# Altium PCB MonitorPCB-v1.1.PcbDoc (part 2 of 2)
Units mm, origin at the board's own origin, x right, y up, seen from the top; angles counter-clockwise.
Board outline 144.83 x 35 mm, 2 copper layers (Top Layer, Bottom Layer), stack 1.57 mm thick; 68 components, 45 nets, 203 pads, 57 vias.
Unrouted connection lines stored in the file: 41.
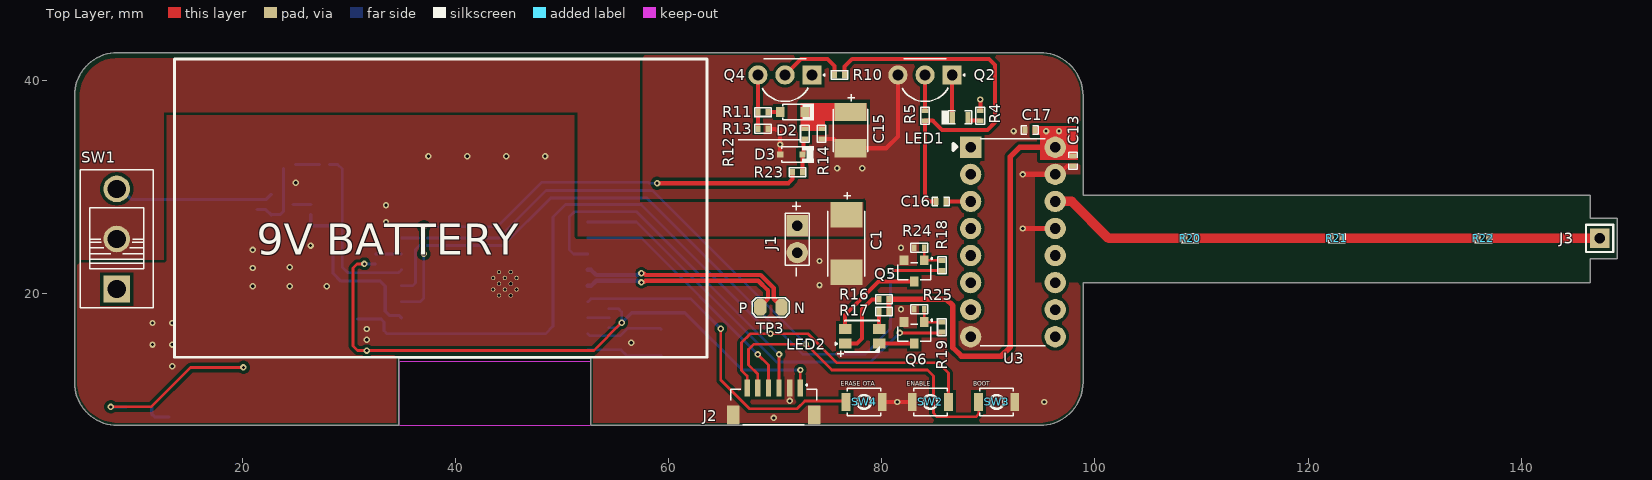
[diagram p0: Top Layer view]

## Part data (continued)
R12 R13 R14: library part RC0402FR-07100KL, "RES 100K OHM 1% 1/16W 0402", Case Code (Imperial)=0402, Case Code (Metric)=1005, LCSC Part Number=C60491, Manufacturer=Yageo, Max Operating Temperature=155°C, Max Power Dissipation=63mW, Min Operating Temperature=-55°C, Package Quantity=1, Resistance=100kR, Resistance Tolerance=1%, Resistor Type="Thick Film", Supplier Part Number 1=603-RC0402FR-07100KL, Temperature Coefficient=100ppm/°C, Voltage Rating=50V, Case/Package=0402, Category="Chip SMD Resistors", ComponentLink1Description=https://datasheet.ciiva.com/11819/0900766b80c66297-11819452.pdf?src-supplier=RSComponents, ComponentLink1URL=https://datasheet.ciiva.com/11819/0900766b80c66297-11819452.pdf?src-supplier=RSComponents, ComponentLink2Description=https://datasheet.ciiva.com/22747/1018594-22747509.pdf?src-supplier=Element14, ComponentLink2URL=https://datasheet.ciiva.com/22747/1018594-22747509.pdf?src-supplier=Element14, ComponentLink3Description=https://datasheet.ciiva.com/2453/pyu-r-int-thick-7-2453362.pdf?src-supplier=Digi-Key, ComponentLink3URL=https://datasheet.ciiva.com/2453/pyu-r-int-thick-7-2453362.pdf?src-supplier=Digi-Key, ComponentLink4Description=https://datasheet.ciiva.com/2453/pyu-r-int-thick-7-2453363.pdf?src-supplier=Digi-Key, ComponentLink4URL=https://datasheet.ciiva.com/2453/pyu-r-int-thick-7-2453363.pdf?src-supplier=Digi-Key, ComponentLink5Description=https://datasheet.ciiva.com/2453/pyu-r-int-thick-7-2453361.pdf?src-supplier=Digi-Key, ComponentLink5URL=https://datasheet.ciiva.com/2453/pyu-r-int-thick-7-2453361.pdf?src-supplier=Digi-Key, ComponentLink6Description=https://datasheet.ciiva.com/12667/pyu-rc0402-51-rohs-l-6-r-12667930.pdf?src-supplier=Mouser, ComponentLink6URL=https://datasheet.ciiva.com/12667/pyu-rc0402-51-rohs-l-6-r-12667930.pdf?src-supplier=Mouser, ComponentLink7Description=https://datasheet.ciiva.com/15189/getdatasheetpartid-323696-15189334.pdf?src-supplier=Verical, ComponentLink7URL=https://datasheet.ciiva.com/15189/getdatasheetpartid-323696-15189334.pdf?src-supplier=Verical, Construction=Rectangular, Depth=0.5mm, Features="Moisture Resistant", Height=0.016inch, Item Type=Resistor, Lead Free="Lead Free", Length=0.039inch, Manufacturer Part Number=RC0402FR-07100KL, Military Standard=Not, Number of Terminations=2, Packaging="Tape and Reel", Power Rating=63mW, Pricing 1="1=0.10000, 10=0.01200, 50=0.01200, 100=0.00500, 1000=0.00300, 2500=0.00200, 10000=0.00100 (USD)", REACH SVHC="No SVHC", RoHS=Yes, RoHS Compliant=Yes, Series=RC, Stock 1=7759549, Supplier 1=Mouser, Technology="THICK FILM", Termination=SMD/SMT, Tolerance=1%, Width=0.02inch, Working Voltage=50V
R18 R19: library part RC0402FR-07680RL, "RES 680 OHM 1% 1/16W 0402", Case Code (Imperial)=0402, Case Code (Metric)=1005, Manufacturer=Yageo, Max Operating Temperature=155°C, Max Power Dissipation=63mW, Min Operating Temperature=-55°C, Resistance Tolerance=1%, Resistor Type="Thick Film", Supplier Part Number 1=7948052, Temperature Coefficient=100ppm/°C, Voltage Rating=50V, Case/Package=0402, Category="Chip SMD Resistors", ComponentLink1Description=https://datasheet.ciiva.com/12667/pyu-rc0402-51-rohs-l-6-r-12667916.pdf?src-supplier=Mouser, ComponentLink1URL=https://datasheet.ciiva.com/12667/pyu-rc0402-51-rohs-l-6-r-12667916.pdf?src-supplier=Mouser, ComponentLink2Description=https://datasheet.ciiva.com/7850/1018594-7850071.pdf?src-supplier=Element14, ComponentLink2URL=https://datasheet.ciiva.com/7850/1018594-7850071.pdf?src-supplier=Element14, ComponentLink3Description=https://datasheet.ciiva.com/7850/1018594-7850070.pdf?src-supplier=Element14, ComponentLink3URL=https://datasheet.ciiva.com/7850/1018594-7850070.pdf?src-supplier=Element14, ComponentLink4Description=https://datasheet.ciiva.com/17042/pyu-rc0402-51-rohs-l-6-r-17042399.pdf?src-supplier=Future+Electronics, ComponentLink4URL=https://datasheet.ciiva.com/17042/pyu-rc0402-51-rohs-l-6-r-17042399.pdf?src-supplier=Future+Electronics, Construction=Rectangular, Depth=0.5mm, Features="Moisture Resistant", Item Type=Resistor, Lead Free="Lead Free", Length=1mm, Manufacturer Part Number=RC0402FR-07680RL, Military Standard=Not, Number of Terminations=2, Packaging="Tape and Reel", Power Rating=63mW, Pricing 1="10000=0.0011, 100000=0.0011, 300000=0.001, 750000=0.001, 2000000=0.0009 (USD)", Reach SVHC Compliant=No, Resistance=680R, RoHS=Yes, RoHS Compliant=Yes, Series=RC, Size Code=0402, Stock 1=5080000, Supplier 1="Future Electronics", Termination=SMD/SMT, Tolerance=1%, Voltage Rating (AC)=50V
R23: library part RC0402FR-070RL, "RES 0 OHM JUMPER 1/16W 0402", Case Code (Imperial)=0402, Case Code (Metric)=1005, LCSC Part Number=C106231, Manufacturer=Yageo, Max Operating Temperature=155°C, Max Power Dissipation=63mW, Min Operating Temperature=-55°C, Power Rating=62.5mW, Resistance=0R, Resistor Type="Thick Film", Supplier Part Number 1=603-RC0402FR-070RL, Temperature Coefficient=200ppm/°C, Tolerance=1%, Voltage Rating=50V, Case/Package=0402, ComponentLink1Description=https://datasheet.ciiva.com/8896/pyu-rc0402-51-rohs-l-6-8896149.pdf?src-supplier=Avnet, ComponentLink1URL=https://datasheet.ciiva.com/8896/pyu-rc0402-51-rohs-l-6-8896149.pdf?src-supplier=Avnet, ComponentLink2Description=https://datasheet.ciiva.com/16790/pyu-rc0402-51-rohs-l-6-r-16790444.pdf?src-supplier=Future+Electronics, ComponentLink2URL=https://datasheet.ciiva.com/16790/pyu-rc0402-51-rohs-l-6-r-16790444.pdf?src-supplier=Future+Electronics, Contact Plating=Tin,Matte, Features="Moisture Resistant", Height=0.35mm, Item Type=Resistors, Lead Free="Lead Free", Length=1mm, Manufacturer Part Number=RC0402FR-070RL, Mount="Surface Mount", Number of Terminations=2, Packaging="Tape and Reel", Pricing 1="1=0.10000, 10=0.01400, 50=0.01400, 100=0.00600, 1000=0.00300, 5000=0.00200, 10000=0.00100 (USD)", Radiation Hardening=No, RoHS=Yes, RoHS Compliant=Yes, Series=RC, Size Code=0402, Stock 1=8556842, Supplier 1=Mouser, Termination=SMD/SMT, Width=0.5mm
SW1: "3A Direct Insert Single Pole Double Throw (SPDT) 125V Black 10,000 times Plugin Slide Switches ROHS", LCSC Part Number=C319011, Manufacturer="XKB Connectivity", Package=Plugin, ComponentLink1Description=LCSC, ComponentLink1URL=https://www.lcsc.com/product-detail/Slide-Switches_XKB-Connection-SS-12D10L9_C319011.html, Item Type=Switch
SW2 SW3 SW4: "SWITCH TACTILE SPST-NO 0.05A 12V", Contact Current Rating=50mA, Contact Resistance=100mR, Insulation Resistance=100MR, LCSC Part Number=C231329, Manufacturer=Omron, Max Operating Temperature=70°C, Max Voltage Rating (DC)=12V, Min Operating Temperature=-25°C, Operating Force=1.5N, Package Quantity=1, Ratings="Dust Proof,IP40", Supplier Part Number 1=SW1020DKR-ND, Actuator Length=0.4mm, Actuator Type=Standard, ComponentLink1Description=http://www.farnell.com/datasheets/60838.pdf?src-supplier=Farnell, ComponentLink1URL=http://www.farnell.com/datasheets/60838.pdf?src-supplier=Farnell, ComponentLink2Description=http://www.farnell.com/datasheets/60838.pdf?src-supplier=Element14, ComponentLink2URL=http://www.farnell.com/datasheets/60838.pdf?src-supplier=Element14, ComponentLink3Description=https://omronfs.omron.com/en_US/ecb/products/pdf/en-b3u.pdf?src-supplier=Digi-Key, ComponentLink3URL=https://omronfs.omron.com/en_US/ecb/products/pdf/en-b3u.pdf?src-supplier=Digi-Key, ComponentLink4Description=http://www.omron.com/ecb/products/pdf/en-b3u.pdf?src-supplier=Digi-Key, ComponentLink4URL=http://www.omron.com/ecb/products/pdf/en-b3u.pdf?src-supplier=Digi-Key, ComponentLink5Description=https://www.distrelec.biz/Web/Downloads/he/et/B3U_eng_datasheet.pdf?mime=application%2Fpdf&src-supplier=Distrelec, ComponentLink5URL=https://www.distrelec.biz/Web/Downloads/he/et/B3U_eng_datasheet.pdf?mime=application%2Fpdf&src-supplier=Distrelec, ComponentLink6Description=http://www.onlinecomponents.com/productFiles/mf-OM/en-b3u.pdf?src-supplier=Onlinecomponents.com, ComponentLink6URL=http://www.onlinecomponents.com/productFiles/mf-OM/en-b3u.pdf?src-supplier=Onlinecomponents.com, ComponentLink7Description=https://www.verical.com/server-webapp/html/getDatasheet?partID=552554&src-supplier=Verical, ComponentLink7URL=https://www.verical.com/server-webapp/html/getDatasheet?partID=552554&src-supplier=Verical, ComponentLink8Description=http://www.farnell.com/datasheets/1685550.pdf?src-supplier=Element14, ComponentLink8URL=http://www.farnell.com/datasheets/1685550.pdf?src-supplier=Element14, ComponentLink9Description=http://www.farnell.com/datasheets/2610940.pdf?src-supplier=Farnell, ComponentLink9URL=http://www.farnell.com/datasheets/2610940.pdf?src-supplier=Farnell, ComponentLink10Description=https://www.alliedelec.com/m/d/4c8a9ef82804fc3c241a13c1e298fd73.pdf?src-supplier=Allied+Electronics, ComponentLink10URL=https://www.alliedelec.com/m/d/4c8a9ef82804fc3c241a13c1e298fd73.pdf?src-supplier=Allied+Electronics, Contact Material=Silver, Current Rating=50mA, Depth=2.5mm, Electrical Life=200000Cycles, Height=1.2mm, Illumination Type=Non-Illuminated,Illuminated, Item Type=Switch, Lead Free="Lead Free", Length=4mm, Manufacturer Part Number=B3U-1000P, Max Current Rating=50mA, Mechanical Life=200000Cycles, Mount="Surface Mount", Orientation=Straight, Packaging="Tape and Reel", Pricing 1="1=1, 10=0.961, 25=0.9064, 50=0.7976, 100=0.7251, 250=0.68888, 500=0.67074, 1000=0.52571 (USD)", REACH SVHC=Unknown, Stock 1=116454, Supplier 1=Digi-Key, Switch Function=Off-Mom, Switch Travel=0.15mm, Termination=SMD/SMT, Throw Configuration=SPST, Voltage Rating (DC)=12V, Weight=0.000776oz, Width=3mm
TP1 TP2: "Test Point ON", Item Type="Test Point", Manufacturer Part Number="TEST POINT 0.5mm Dia"
TP3: "Wire Connecting Pad", Item Type="Test Point", Manufacturer Part Number="2 Test Pad"
U1: "RF TXRX MOD BT WIFI PCB TH SMD", Clock Frequency=2.484GHz, LCSC Part Number=C2934560, Manufacturer="Espressif Systems", Max Operating Temperature=85°C, Max Supply Voltage=3.6V, Min Operating Temperature=-40°C, Min Supply Voltage=3V, Bandwidth=72MHz, ComponentLink1Description=https://datasheet.octopart.com/ESP32-C3-WROOM-02-N4-Espressif-Systems-datasheet-165560559.pdf?src-supplier=TME, ComponentLink1URL=https://datasheet.octopart.com/ESP32-C3-WROOM-02-N4-Espressif-Systems-datasheet-165560559.pdf?src-supplier=TME, Data Rate=150Mbps, Height=3.35mm, Interface=39,40,224,1514,1518,1532Interface, Item Type=Module, Manufacturer Part Number=ESP32-C3-WROOM-02-N4, Number of GPIO=15NUMBER, Pricing="1=3.28, 10=2.836, 25=2.6796, 100=2.4652, 250=2.33652 (USD)", RoHS=No, Supplier=Digikey
U2: "IC REG BUCK 3.3V 2A TSOT26", LCSC Part Number=C780769, Manufacturer=Diodes, Supplier Part Number=6109504, Category="Voltage Regulators - Switching", ComponentLink1Description=https://www.diodes.com/assets/Datasheets/AP63200-AP63201-AP63203-AP63205.pdf?src-supplier=Digi-Key, ComponentLink1URL=https://www.diodes.com/assets/Datasheets/AP63200-AP63201-AP63203-AP63205.pdf?src-supplier=Digi-Key, Item Type=IC, Manufacturer Part Number=AP63203WU-7, Pricing="3000=0.34, 6000=0.335, 9000=0.33, 12000=0.33, 15000=0.32 (USD)", RoHS=Yes, Stock=3000, Supplier="Future Electronics"
U3: "Rising Edge 3V~15V 1 11MHz DIP-16 Counters, Dividers ROHS", LCSC Part Number=C32710674, Manufacturer=lingxingic, Package=DIP-16, Item Type=IC, Manufacturer Part Number=CD4017BE(LX)
X1: "32.768kHz Surface Mount Crystal 12.5pF ±20ppm SMD3215-2P Crystals ROHS", LCSC Part Number=C32346, Manufacturer=Epson, ComponentLink1Description=https://datasheet.octopart.com/Q13FC13500004-Epson-datasheet-62043850.pdf?src-supplier=Farnell, ComponentLink1URL=https://datasheet.octopart.com/Q13FC13500004-Epson-datasheet-62043850.pdf?src-supplier=Farnell, ComponentLink2Description=https://datasheet.octopart.com/Q13FC13500004-Epson-datasheet-32025749.pdf?src-supplier=Newark, ComponentLink2URL=https://datasheet.octopart.com/Q13FC13500004-Epson-datasheet-32025749.pdf?src-supplier=Newark, Item Type=Crystals, Manufacturer Part Number=Q13FC13500004, Reach SVHC Compliant=4187SVHC, RoHS=Yes, Stock=52665, Supplier=Farnell

## Via types
v1: diameter 0.6, hole 0.3, Top Layer to Bottom Layer, tented both sides, 57 vias

## Nets (pads, with @x,y where several pads share a name; then routed paths per layer and width w, separated by ;. In a path a pad name is that pad's centre, name@x,y a point inside that pad or via, vN(x,y) a via of type N, cw(c..) or ccw(c..) an arc to the next point about the centre after c; other vN are vias at no path point)
3V3: C2.2 C3.2 C5.1 C6.1 C11.2 C12.2 J2.1 L1.2 R1.2 R2.2 R3.2 R15.2 TP1.1 U1.1 U2.1 | length 76.3
  Top Layer w0.254: v1(7.62,9.398) 11.405,9.398 15.107,13.101 v1(20.068,13.101) ; v1(31.42,22.815) 30.732,22.815 30.353,22.436 30.353,15.101 30.775,14.678 v1(31.636,14.678) 52.956,14.678 v1(55.575,17.297) ; J2.1@72.35,11.183 v1(72.35,12.857)
  Bottom Layer w0.254: v1(7.62,9.398) 7.625,9.393 9.056,9.393 U2.1 ; v1(31.42,22.815) R3.2 ; R2.2 55.093,16.815 v1(55.575,17.297) 55.575,18.315 55.297,18.593 R15.2
  Bottom Layer w0.305: v1(55.575,17.297) 56.507,18.229 61.501,18.229 66.873,12.857 v1(72.35,12.857)
9V: C8.2 C13.2 C17.2 Q1.2 Q4.1 R4.2 R7.1 R16.1 R17.1 SW1.3 U2.2 U2.3 U3.16 | length 56.9
  Top Layer w0.381: R4.2 v1(89.24,38.252) ; U3.16@96.114,33.761 96.588,33.761 97.369,32.979 97.923,32.979 C13.2
  Top Layer w0.508: R16.1 86.068,19.492 86.667,18.893 86.667,14.946 87.458,14.155 91.187,14.155 92.056,15.024 92.056,32.899 92.917,33.761 U3.16@96.114,33.761
  Bottom Layer w0.305: SW1.3 8.593,29.854 9.593,28.854 R7.1 22.181,28.854 22.661,29.335 Q1.2
  other v1: 95.415,35.281 96.622,35.281
9V#: C1.1 J1.1 SW1.2
BAT_ADC: C14.2 D1.2 R6.1 R9.2 U1.3 | length 17
  Bottom Layer w0.305: R6.1 R9.2 C14.2 28.193,26.391 28.478,26.106 D1.2 28.478,21.946 29.22,21.205 32.903,21.205 33.376,20.732 33.376,18.352 33.748,17.98 34.674,17.98 U1.3
ESP-EN: C4.2 J2.6 R1.1 SW2.1 U1.2 | length 84.4
  Top Layer w0.254: J2.6 67.35,12.296 66.822,12.824 66.822,15.429 67.65,16.257 v1(69.548,16.257) 73.077,16.257 75.805,13.529 85.306,13.529 86.257,12.578 SW2.1
  Bottom Layer w0.254: R1.1 C4.2 32.995,17.644 33.27,17.369 33.27,16.548 33.563,16.255 U1.2 48.411,16.255 49.124,16.967 49.124,27.203 50.317,28.397 57.408,28.397 v1(69.548,16.257)
GND: C1.2 C2.1 C3.1 C4.1 C5.2 C6.2 C8.1 C9.1 C10.1 C11.1 C12.1 C13.1 C14.1 C15.2 C17.1 D1.1 D3.1 J1.2 J2.2 J2.MP1 J2.MP2 Q2.3 Q3.2 Q5.2 Q6.2 R9.1 R13.1 R14.1 R24.1 R25.1 SW2.2 SW3.2 SW4.2 TP2.1 U1.9 U1.19 U1.20 U1.21 U1.22 U1.23 U1.24 U1.25 U1.26 U1.27 U1.28 U1.29 U1.30 U1.31 U1.32 U1.33 U1.34 U1.35 U1.36 U1.37 U1.38 U1.39 U2.4 U3.8 U3.13 U3.15 | length 27.9
  Top Layer w0.381: R13.1 70.036,35.498 70.444,35.09 D3.1 ; R14.1 75.517,34.558 76.403,33.673 C15.2 80.409,33.673 81.511,34.775 Q2.3 ; SW4.2 SW2.2 ; U3.15@96.114,31.221 96.588,31.221 97.369,32.002 97.923,32.002 C13.1
  Top Layer w0.508: v1(93.218,26.141) U3.13@96.114,26.141 ; v1(93.218,31.221) U3.15@96.114,31.221
  other v1: 69.85,8.357 81.445,9.856 95.25,9.856 71.35,9.956 13.386,13.208 11.532,15.24 13.386,15.24 56.464,15.418 31.636,15.694 31.636,16.705 11.532,17.272 13.386,17.272 81.793,18.563 20.95,20.726 24.418,20.726 27.887,20.726 74.143,20.824 20.95,22.428 24.418,22.497 74.143,23.089 20.95,24.13 81.793,24.333 26.378,24.536 33.452,26.755 33.452,28.321 24.988,30.429 75.794,31.801 78.157,31.801 37.432,32.918 41.084,32.918 44.735,32.918 48.387,32.918 70.444,34.025 92.367,35.281
GPIO2: R2.1 U1.16 | length 2
  Bottom Layer w0.254: U1.16 R2.1
GPIO3: R15.1 SW4.1 U1.15 | length 31.8
  Top Layer w0.254: v1(64.872,16.728) 64.872,11.916 67.568,9.22 72.037,9.22 72.773,9.956 76.534,9.956 SW4.1
  Bottom Layer w0.254: U1.15 52.678,19.533 R15.1 62.067,19.533 v1(64.872,16.728)
GPIO5: R23.2 U1.4 | length 46.1
  Top Layer w0.254: v1(37.007,23.755) v1(37.008,26.314)
  Top Layer w0.381: v1(58.903,30.389) 71.226,30.389 71.604,30.768 R23.2
  Bottom Layer w0.254: U1.4 36.628,19.255 37.007,19.633 v1(37.007,23.755) ; v1(37.008,26.314) 43.936,26.314 48.107,30.486 58.095,30.486 58.191,30.389 v1(58.903,30.389)
GPIO6: R18.1 U1.5 | length 68.5
  Top Layer w0.254: v1(80.81,22.19) 80.822,22.201 85.637,22.201 R18.1
  Bottom Layer w0.254: U1.5 35.944,20.755 36.22,21.031 36.22,24.155 36.601,24.536 44.446,24.536 48.917,29.007 57.926,29.007 72.607,14.326 78.396,14.326 80.81,16.74 v1(80.81,22.19)
GPIO7: R8.1 U1.6 | length 16.5
  Bottom Layer w0.254: R8.1 28.919,32.154 29.358,31.715 29.358,22.497 29.869,21.986 34.631,21.986 U1.6
GPIO8: R3.1 U1.7 | length 2.4
  Bottom Layer w0.254: R3.1 U1.7
GPIO9: J2.5 SW3.1 U1.8 | length 77.7
  Top Layer w0.254: J2.5 68.35,12.473 67.488,13.335 67.488,14.792 67.977,15.281 v1(72.875,15.281) 75.3,12.857 84.273,12.857 84.836,12.294 84.836,8.814 85.192,8.458 88.824,8.458 89.08,8.714 SW3.1
  Bottom Layer w0.254: U1.8 44.033,25.255 48.486,29.708 58.448,29.708 v1(72.875,15.281)
GPIO10: R19.2 U1.10 | length 39.8
  Top Layer w0.254: v1(81.673,16.338) 85.563,16.338 R19.2
  Bottom Layer w0.254: U1.10 56.951,26.755 70.104,13.602 78.936,13.602 v1(81.673,16.338)
NetC7_1: C7.1 L1.1 U2.5
NetC7_2: C7.2 U2.6 | length 2.4
  Bottom Layer w0.305: U2.6 11.462,8.72 11.733,8.448 C7.2
NetC15_1: C15.1 D2.1 R12.1 R14.2
NetC16_1: C16.1 U3.3 | length 2.3
  Top Layer w0.381: C16.1 U3.3
NetD2_2: D2.2 R11.2 | length 1.2
  Top Layer w0.381: R11.2 D2.2
NetD3_2: D3.2 R12.2 R23.1 | length 3.3
  Top Layer w0.381: R23.1 D3.2 72.653,33.194 72.653,34.52 72.691,34.558 R12.2
NetJ3_1: J3.1 R22.2 | length 10.2
  Top Layer w0.9: R22.2@137.157,25.218 J3.1
NetLED1_1: LED1.1 R4.1 | length 1.1
  Top Layer w0.381: LED1.1@88.15,36.258 R4.1
NetLED1_2: LED1.2 Q2.1 | length 4
  Top Layer w0.381: LED1.2 Q2.1
NetLED2_1: LED2.1 R16.2 | length 6.5
  Top Layer w0.381: LED2.1 77.68,15.352 78.151,15.824 78.151,18.563 79.08,19.492 R16.2
NetLED2_2: LED2.2 Q5.3 | length 9.1
  Top Layer w0.381: LED2.2 76.551,18.004 79.701,21.153 Q5.3
NetLED2_3: LED2.3 R17.2 | length 1.6
  Top Layer w0.381: R17.2 79.731,16.723 LED2.3
NetLED2_4: LED2.4 Q6.3 | length 3.3
  Top Layer w0.381: LED2.4 Q6.3
NetQ1_1: Q1.1 Q3.3 R7.2 | length 6.8
  Bottom Layer w0.305: R7.2 22.181,27.915 22.661,27.434 Q1.1 ; Q1.1@22.711,27.445 23.499,27.445 23.838,27.783 Q3.3
NetQ2_2: Q2.2 R5.2 | length 3.4
  Top Layer w0.381: R5.2 Q2.2
NetQ3_1: Q3.1 R8.2 | length 2.2
  Bottom Layer w0.305: Q3.1 R8.2
NetQ4_2: Q4.2 R10.2 | length 6.4
  Top Layer w0.381: Q4.2 72.416,42.062 74.893,42.062 75.553,41.403 R10.2
NetQ4_3: Q4.3 R11.1 R13.2 | length 5.1
  Top Layer w0.381: R13.2 Q4.3
NetQ5_1: Q5.1 R18.2 R24.2 | length 2.8
  Top Layer w0.254: R24.2 Q5.1 R18.2
NetQ6_1: Q6.1 R19.1 R25.2 | length 2.9
  Top Layer w0.254: R25.2 Q6.1 R19.1
NetR20_1: R20.1 U3.14 | length 13.4
  Top Layer w0.9: U3.14 97.823,28.681 101.286,25.218 108.222,25.218
NetR20_2: R20.2 R21.2 | length 12.3
  Top Layer w0.9: 109.632,25.218 121.982,25.218
NetR21_1: R21.1 R22.1 | length 12.3
  Top Layer w0.9: 123.397,25.218 135.74,25.218
OUT: C16.2 R5.1 R10.1 | length 36.4
  Top Layer w0.381: R10.1 76.493,41.337 77.217,42.062 90.042,42.062 90.622,41.482 90.622,36.113 89.899,35.39 85.641,35.39 84.772,36.258 R5.1 84.051,29.076 84.446,28.681 C16.2
RXD0: J2.4 U1.11 | length 24.1
  Top Layer w0.254: v1(68.35,14.326) 69.35,13.326 J2.4
  Bottom Layer w0.254: U1.11 57.426,25.255 68.35,14.331 v1(68.35,14.326)
TXD0: J2.3 U1.12 | length 33.6
  Top Layer w0.254: J2.3 v1(70.35,14.326)
  Bottom Layer w0.254: U1.12 51.048,23.755 50.648,24.155 50.648,27.203 51.156,27.711 56.964,27.711 v1(70.35,14.326)
USB_D_N: TP3.1 U1.13 | length 20.4
  Top Layer w0.406: v1(57.429,21.932) 57.466,21.895 57.683,21.895 57.807,21.771 68.624,21.771 69.847,20.549 69.847,19.542 70.58,18.809 TP3.1
  Bottom Layer w0.406: U1.13 52.7,22.255 53.183,21.771 57.052,21.771 57.176,21.895 57.392,21.895 v1(57.429,21.932)
USB_D_P: TP3.2 U1.14 | length 19.5
  Top Layer w0.406: v1(57.429,21.078) 57.466,21.115 57.683,21.115 57.807,21.238 68.403,21.238 69.313,20.328 69.313,19.542 68.58,18.809 TP3.2
  Bottom Layer w0.406: U1.14 52.7,20.755 53.183,21.238 57.052,21.238 57.176,21.115 57.392,21.115 v1(57.429,21.078)
V_MON: Q1.3 R6.2 | length 1.7
  Bottom Layer w0.305: Q1.3 R6.2
XTAL_32K_N: C10.2 U1.17 X1.2 | length 7.3
  Bottom Layer w0.254: U1.17 52.576,16.078 55.454,16.078 56.165,16.789 C10.2 59.162,16.789 X1.2
XTAL_32K_P: C9.2 U1.18 X1.1 | length 7.1
  Bottom Layer w0.254: U1.18 55.515,14.755 56.077,14.193 57.429,14.193 X1.1
pads on no net: SW1.1 U3.1 U3.2 U3.4 U3.5 U3.6 U3.7 U3.9 U3.10 U3.11 U3.12

## Polygon pours and split planes (outlines as drawn)
GND on Bottom Layer "GND_L02_P011" (solid, remove dead copper, pour order 11): 98.882,30.491 94.107,30.491 94.107,26.871 98.882,26.871 98.882,21.027 98.882,11.692 cw(c94.844,11.692) 94.844,7.653 64.16,7.653 64.16,13.979 23.317,13.979 23.317,7.653 8.255,7.653 cw(c8.255,11.692) 4.216,11.692 4.216,38.617 cw(c8.255,38.617) 8.255,42.655 94.844,42.655 cw(c94.844,38.617) 98.882,38.617
9V on Bottom Layer "9V_L02_P009" (solid, pour order 9): 98.4,38.151 ccw(c94.361,38.151) 94.361,42.189 8.509,42.189 ccw(c8.509,38.354) 4.674,38.354 4.674,10.846 5.482,10.038 10.262,10.038 10.262,17.323 11.786,18.847 11.786,36.474 94.844,36.474 94.844,32.537 98.4,32.537
NetC7_1 on Bottom Layer "NETC7_1_L02_P003" (solid, pour order 3): 10.962,10.638 13.017,10.638 13.367,10.988 19.619,10.988 19.964,10.643 19.964,8.534 19.71,8.28 14.3,8.28 13.421,9.159 12.428,9.159 12.428,10.038 10.962,10.038
3V3 on Bottom Layer "3V3_L02_P004" (solid, pour order 4): 15.293,12.388 15.293,13.788 15.742,14.237 15.742,18.059 20.472,18.059 20.472,12.388
3V3 on Bottom Layer "3V3_L02_P008" (solid, pour order 8): 36.052,14.183 36.22,14.351 36.22,15.088 35.941,15.367 33.518,15.367 33.358,15.207 30.099,15.207 30.099,16.476 31.077,16.476 31.077,16.933 29.971,16.933 15.742,16.933 15.742,14.183 28.415,14.183
GND on Top Layer "GND_L01_P012" (solid, remove dead copper, pour order 12): 98.882,31.221 94.361,31.221 94.361,21.027 98.882,21.027 98.882,11.692 cw(c94.844,11.692) 94.844,7.653 52.652,7.653 52.652,13.979 34.65,13.979 34.65,7.653 8.255,7.653 cw(c8.255,11.692) 4.216,11.692 4.216,38.617 cw(c8.255,38.617) 8.255,42.655 94.844,42.655 cw(c94.844,38.617) 98.882,38.617
9V# on Top Layer "9V#_L01_P010" (solid, pour order 10): 4.724,38.608 cw(c8.255,38.608) 8.255,42.139 57.252,42.139 57.252,28.626 78.232,28.626 78.232,25.425 51.435,25.425 51.435,37.059 12.573,37.059 12.573,23.216 4.724,23.216

## Other copper
Top Layer:
  region net NetR20_1: 108.687,25.668 107.899,25.668 107.899,24.768 108.687,24.768
  rectangle net NetR20_2: 109.169,24.768 109.957,25.668
  rectangle net NetR21_1: 122.936,24.768 123.723,25.668
  region net NetR20_2: 122.453,25.668 121.666,25.668 121.666,24.768 122.453,24.768
  region net NetR21_1: 136.22,25.668 135.433,25.668 135.433,24.768 136.22,24.768
  rectangle net NetJ3_1: 136.703,24.768 137.49,25.668
  rectangle net 9V: 94.132,34.899 98.394,35.753
  rectangle net 9V: 94.844,32.575 98.394,35.753
  rectangle net 9V: 80.442,18.021 80.899,19.809
  rectangle net NetC15_1: 72.374,35.269 74.663,37.923
  rectangle net NetC15_1: 72.374,36.223 78.553,37.923
Bottom Layer:
  pour cut-out: 14.988,12.083 14.982,12.083 14.982,10.988 16.021,10.988 16.021,11.05 ccw(c14.988,11.05)
  pour cut-out: 6.35,18.796 9.982,18.796 9.982,26.785 6.35,26.785
  pour cut-out: 79.998,42.215 79.998,39.04 88.113,39.04 88.113,42.215
  pour cut-out: 66.853,42.215 66.853,39.04 72.546,39.04 72.546,42.215

## Silkscreen, mask and mechanical layers (free items; w line width, h text height)
Top Overlay:
  lines w0.127: 66.497,34.488 72.342,34.488
  lines w0.254: 13.59,14.054 63.59,14.054 63.59,42.054 13.59,42.054 13.59,14.054
  text "9V BATTERY" at 21.313,22.713 h5
  text "P" at 66.55,18.195 h1
  text "N" at 71.785,18.195 h1
  text "ERASE OTA" at 76.14,11.231 h0.7
  text "ENABLE" at 82.334,11.231 h0.7
  text "BOOT" at 88.57,11.231 h0.7
Bottom Overlay:
  text "GND" at 28.929,19.779 h0.7 r270
  text "3V3" at 28.929,12.179 h0.7 r270
  text "Rev-v1.1" at 94.598,9.105 h1.5
Board Outline:
  lines w0.254: 34.65,7.653 8.255,7.653 cw(c8.255,11.692) 4.216,11.692 4.216,38.617 cw(c8.255,38.617) 8.255,42.655 94.844,42.655 cw(c94.844,38.617) 98.882,38.617 98.882,29.282 146.507,29.282 146.507,27.123 149.047,27.123 149.047,23.313 146.507,23.313 146.507,21.027 98.882,21.027 98.882,11.692 cw(c94.844,11.692) 94.844,7.653 52.652,7.653 ; 34.65,7.655 34.65,13.979 52.652,13.979 52.652,7.655 ; 4.216,56.134 ccw(c4.216,56.134) 4.216,56.134
Fabrication:
  drawing of 191 lines, arcs and shapes, not listed
  text "Layer" at 156.375,63.068 h1.52
  text "Name" at 166.787,63.068 h1.52
  text "Material" at 190.402,63.068 h1.52
  text "Thickness" at 212.24,63.068 h1.52
  text "Constant" at 228.746,63.068 h1.52
  text "Board Layer Stack" at 243.221,63.068 h1.52
  text "Top Overlay" at 166.787,60.02 h1.52
  text "Top Solder" at 166.787,56.972 h1.52
  text "Solder Resist" at 190.402,56.972 h1.52
  text "0.010mm" at 212.24,56.972 h1.52
  text "3.5" at 228.746,56.972 h1.52
  text "1" at 156.375,53.924 h1.52
  text "Top Layer" at 166.787,53.924 h1.52
  text "0.035mm" at 212.24,53.924 h1.52
  text "Dielectric 1" at 166.787,50.876 h1.52
  text "FR-4" at 190.402,50.876 h1.52
  text "1.500mm" at 212.24,50.876 h1.52
  text "4.8" at 228.746,50.876 h1.52
  text "Note: / Vias must be Tented" at 5.029,48.919 h5
  text "2" at 156.375,47.828 h1.52
  text "Bottom Layer" at 166.787,47.828 h1.52
  text "0.035mm" at 212.24,47.828 h1.52
  text "Bottom Solder" at 166.787,44.78 h1.52
  text "Solder Resist" at 190.402,44.78 h1.52
  text "0.010mm" at 212.24,44.78 h1.52
  text "3.5" at 228.746,44.78 h1.52
  text "Bottom Overlay" at 166.787,41.732 h1.52
  text "Total board thickness:" at 156.375,38.684 h1.52
  text "1.590mm" at 212.24,38.684 h1.52
Drill Drawing:
  circle w0.254: c6.975,75.231 r0.847
  lines w0.254: 6.129,78.194 6.975,78.617 7.822,78.194 7.399,79.041 7.822,79.887 6.975,79.464 6.129,79.887 6.552,79.041 6.129,78.194 ; 6.129,83.697 7.822,83.697 6.975,82.004 6.129,83.697
  lines w0.381: 4.61,73.241 327.049,73.241 ; 4.61,84.671 327.049,84.671 ; 18.602,69.431 18.602,88.481 ; 32.315,69.431 32.315,88.481 ; 59.993,69.431 59.993,88.481 ; 72.842,69.431 72.842,88.481 ; 91.481,69.431 91.481,88.481 ; 129.569,69.431 129.569,88.481 ; 144.551,69.431 144.551,88.481 ; 163.495,69.431 163.495,88.481 ; 180,69.431 180,88.481 ; 201.686,69.431 201.686,88.481 ; 235.559,69.431 235.559,88.481 ; 269.433,69.431 269.433,88.481 ; 291.423,69.431 291.423,88.481 ; 4.61,69.431 327.049,69.431 327.049,88.481 4.61,88.481 4.61,69.431
  text "Symbol" at 6.896,85.814 h1.83
  text "Count" at 19.745,85.814 h1.83
  text "Hole Size" at 33.458,85.814 h1.83
  text "Plated" at 61.136,85.814 h1.83
  text "Hole Type" at 73.985,85.814 h1.83
  text "Drill Layer Pair" at 92.624,85.814 h1.83
  text "Via/Pad" at 130.712,85.814 h1.83
  text "Pad Shape" at 145.694,85.814 h1.83
  text "Template" at 164.638,85.814 h1.83
  text "Description" at 181.143,85.814 h1.83
  text "Hole Tolerance (+)" at 202.829,85.814 h1.83
  text "Hole Tolerance (-)" at 236.702,85.814 h1.83
  text "Hole Length" at 270.576,85.814 h1.83
  text "Routed Path Length" at 292.566,85.814 h1.83
  text "3" at 19.745,82.004 h1.52
  text "1.700mm (66.93mil)" at 33.458,82.004 h1.52
  text "PTH" at 61.136,82.004 h1.52
  text "Round" at 73.985,82.004 h1.52
  text "Top Layer - Bottom Layer" at 92.624,82.004 h1.52
  text "Pad" at 130.712,82.004 h1.52
  text "(Mixed)" at 145.694,82.004 h1.52
  text "(Mixed)" at 164.638,82.004 h1.52
  text "-" at 270.576,82.004 h1.52
  text "-" at 292.566,82.004 h1.52
  text "25" at 19.745,78.194 h1.52
  text "1.000mm (39.37mil)" at 33.458,78.194 h1.52
  text "PTH" at 61.136,78.194 h1.52
  text "Round" at 73.985,78.194 h1.52
  text "Top Layer - Bottom Layer" at 92.624,78.194 h1.52
  text "Pad" at 130.712,78.194 h1.52
  text "(Mixed)" at 145.694,78.194 h1.52
  text "(Mixed)" at 164.638,78.194 h1.52
  text "-" at 270.576,78.194 h1.52
  text "-" at 292.566,78.194 h1.52
  text "69" at 19.745,74.384 h1.52
  text "0.300mm (11.81mil)" at 33.458,74.384 h1.52
  text "PTH" at 61.136,74.384 h1.52
  text "Round" at 73.985,74.384 h1.52
  text "Top Layer - Bottom Layer" at 92.624,74.384 h1.52
  text "(Mixed)" at 130.712,74.384 h1.52
  text "Rounded" at 145.694,74.384 h1.52
  text "(Mixed)" at 164.638,74.384 h1.52
  text "-" at 270.576,74.384 h1.52
  text "-" at 292.566,74.384 h1.52
  text "97 Total" at 19.745,70.574 h1.52

## Dimensions
4.216,38.617 to 149.047,27.123 on Dimension
4.216,38.617 to 98.882,38.617 on Dimension
94.844,42.655 to 94.844,7.653 on Dimension